# Altium PCB FMC_LPC接口.PcbDoc
Units mil, origin at the board's own origin, x right, y up, seen from the top; angles counter-clockwise.
Board outline 6000 x 4000 mil, 2 copper layers (Top Layer, Bottom Layer); 1 components, 0 nets, 164 pads, 0 vias.
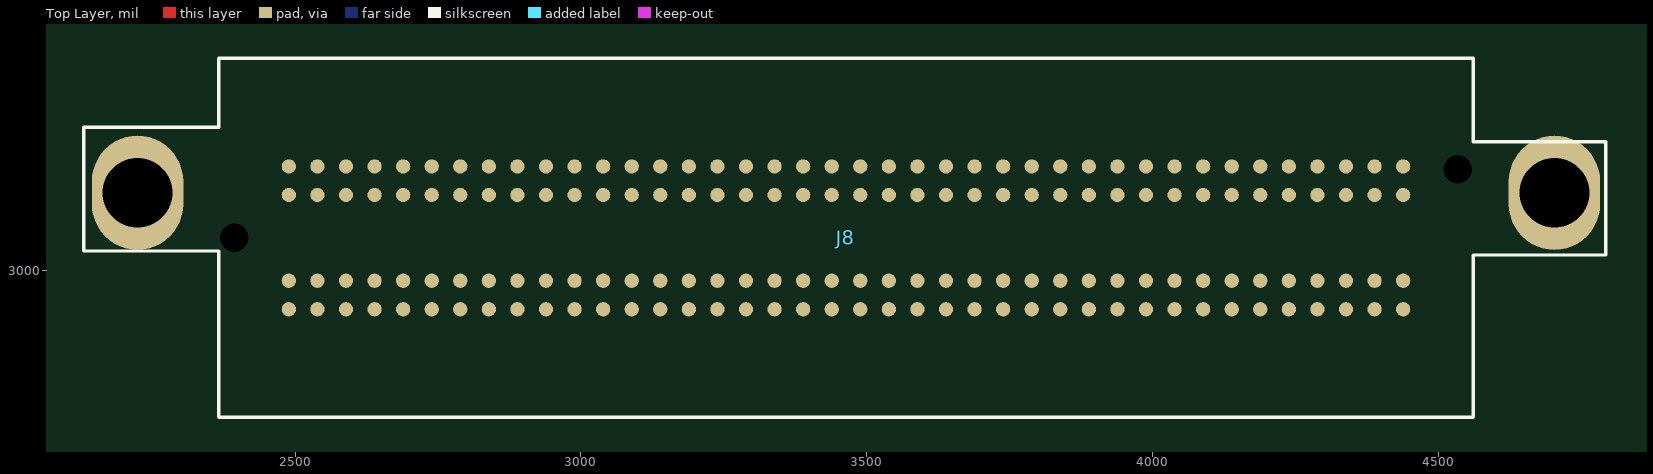
[diagram p0: Top Layer view]
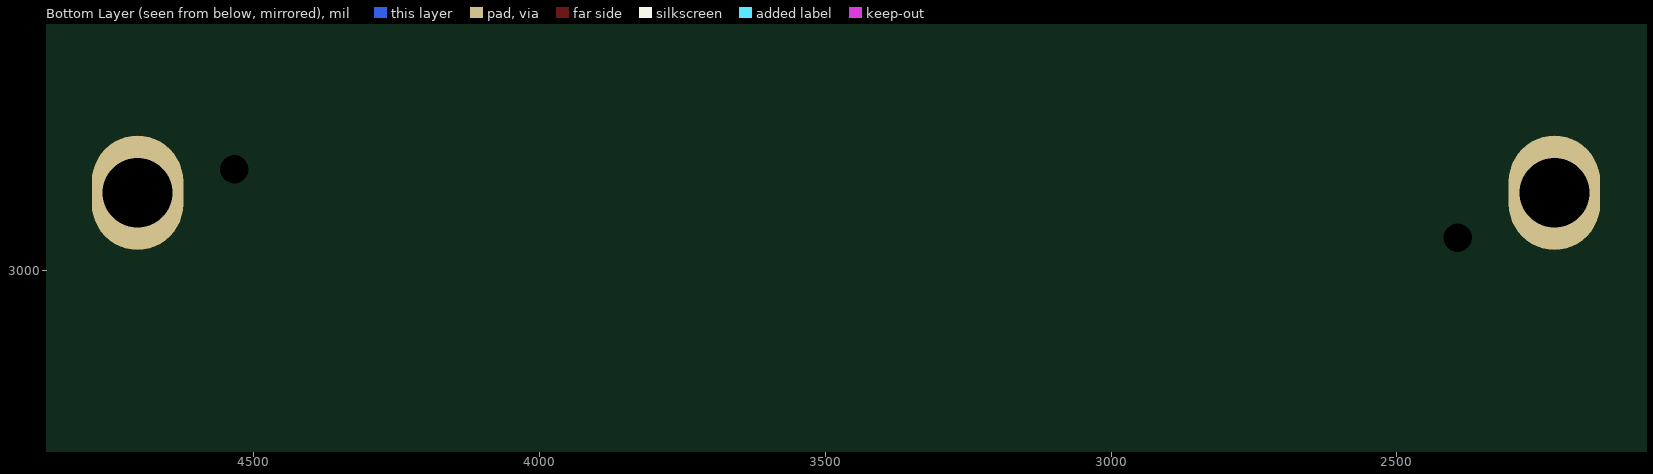
[diagram p1: Bottom Layer view, seen from below]

## Layer stack, top to bottom
Top Solder: solder mask 0.4, Solder Resist, Dk 3.5
Top Layer: signal copper 1.4
Dielectric 1: dielectric 12.6, FR-4, Dk 4.8
Bottom Layer: signal copper 1.4
Bottom Solder: solder mask 0.4, Solder Resist, Dk 3.5

## Board outline
1000,1000 7000,1000 7000,5000 1000,5000

## Design rules (kind name [scope] priority, off if disabled: settings)
Clearance [All] p1: gap=10 ignorepadtopadclearanceinfootprint=FALSE except(0: Arc-Hole Track-Hole SMDPad-Hole THPad-Hole Via-Hole Fill-Hole Poly-Hole Region-Hole Text-Hole)
PolygonConnect [All] p1: connectstyle=Relief reliefconductorwidth=10 reliefentries=4 polygonreliefangle="90 Angle" airgapwidth=10
RoutingVias [All] p1: holewidth=28 width=50 viastyle="Through Hole" minholewidth=28 minwidth=50 maxholewidth=28 maxwidth=50
SolderMaskExpansion [All] p1: expansion=4
Width [All] p1: maxlimit=10 minlimit=10 preferedwidth=10
30 further rules are at their usual default settings.

## Components (designator, comment, footprint, x,y, rotation, side; value= is the part's Value field where it differs from the comment)
J8 "ASP_134604-1" ASP-134604-1 3468,3048 r0 top locked

## Footprints (in the part's own frame and the unit in brackets; to place one, negate y for a bottom-side part, rotate by r counter-clockwise, add the part's x,y. Pads: shape width x height; smd on the part's side, far side on the other; paste and mask are expansions set on the pad)
ASP-134604-1 [mil]
  round 25 smd: C1(-979,-115) C2(-929,-115) C3(-879,-115) C4(-829,-115) C5(-779,-115) C6(-729,-115) C7(-679,-115) C8(-629,-115) C9(-579,-115) C10(-529,-115) C11(-479,-115) C12(-429,-115) C13(-379,-115) C14(-329,-115) C15(-279,-115) C16(-229,-115) C17(-179,-115) C18(-129,-115) C19(-79,-115) C20(-29,-115) C21(21,-115) C22(71,-115) C23(121,-115) C24(171,-115) C25(221,-115) C26(271,-115) C27(321,-115) C28(371,-115) C29(421,-115) C30(471,-115) C31(521,-115) C32(571,-115) C33(621,-115) C34(671,-115) C35(721,-115) C36(771,-115) C37(821,-115) C38(871,-115) C39(921,-115) C40(971,-115) D1(-979,-65) D2(-929,-65) D3(-879,-65) D4(-829,-65) D5(-779,-65) D6(-729,-65) D7(-679,-65) D8(-629,-65) D9(-579,-65) D10(-529,-65) D11(-479,-65) D12(-429,-65) D13(-379,-65) D14(-329,-65) D15(-279,-65) D16(-229,-65) D17(-179,-65) D18(-129,-65) D19(-79,-65) D20(-29,-65) D21(21,-65) D22(71,-65) D23(121,-65) D24(171,-65) D25(221,-65) D26(271,-65) D27(321,-65) D28(371,-65) D29(421,-65) D30(471,-65) D31(521,-65) D32(571,-65) D33(621,-65) D34(671,-65) D35(721,-65) D36(771,-65) D37(821,-65) D38(871,-65) D39(921,-65) D40(971,-65) G1(-979,85) G2(-929,85) G3(-879,85) G4(-829,85) G5(-779,85) G6(-729,85) G7(-679,85) G8(-629,85) G9(-579,85) G10(-529,85) G11(-479,85) G12(-429,85) G13(-379,85) G14(-329,85) G15(-279,85) G16(-229,85) G17(-179,85) G18(-129,85) G19(-79,85) G20(-29,85) G21(21,85) G22(71,85) G23(121,85) G24(171,85) G25(221,85) G26(271,85) G27(321,85) G28(371,85) G29(421,85) G30(471,85) G31(521,85) G32(571,85) G33(621,85) G34(671,85) G35(721,85) G36(771,85) G37(821,85) G38(871,85) G39(921,85) G40(971,85) H1(-979,135) H2(-929,135) H3(-879,135) H4(-829,135) H5(-779,135) H6(-729,135) H7(-679,135) H8(-629,135) H9(-579,135) H10(-529,135) H11(-479,135) H12(-429,135) H13(-379,135) H14(-329,135) H15(-279,135) H16(-229,135) H17(-179,135) H18(-129,135) H19(-79,135) H20(-29,135) H21(21,135) H22(71,135) H23(121,135) H24(171,135) H25(221,135) H26(271,135) H27(321,135) H28(371,135) H29(421,135) H30(471,135) H31(521,135) H32(571,135) H33(621,135) H34(671,135) H35(721,135) H36(771,135) H37(821,135) H38(871,135) H39(921,135) H40(971,135)
  oval 160x200 hole 122: S1(1235.8,88.8) S2(-1243.8,88.8)
  round 0 hole 50: ""(-1074.5,10) ""(1066.5,130)
  silkscreen extent -1338,-304 1326,324

## Nets (pads, with @x,y where several pads share a name; then routed paths per layer and width w, separated by ;. In a path a pad name is that pad's centre, name@x,y a point inside that pad or via, vN(x,y) a via of type N, cw(c..) or ccw(c..) an arc to the next point about the centre after c; other vN are vias at no path point)
pads on no net: J8. J8.C1 J8.C2 J8.C3 J8.C4 J8.C5 J8.C6 J8.C7 J8.C8 J8.C9 J8.C10 J8.C11 J8.C12 J8.C13 J8.C14 J8.C15 J8.C16 J8.C17 J8.C18 J8.C19 J8.C20 J8.C21 J8.C22 J8.C23 J8.C24 J8.C25 J8.C26 J8.C27 J8.C28 J8.C29 J8.C30 J8.C31 J8.C32 J8.C33 J8.C34 J8.C35 J8.C36 J8.C37 J8.C38 J8.C39 J8.C40 J8.D1 J8.D2 J8.D3 J8.D4 J8.D5 J8.D6 J8.D7 J8.D8 J8.D9 J8.D10 J8.D11 J8.D12 J8.D13 J8.D14 J8.D15 J8.D16 J8.D17 J8.D18 J8.D19 J8.D20 J8.D21 J8.D22 J8.D23 J8.D24 J8.D25 J8.D26 J8.D27 J8.D28 J8.D29 J8.D30 J8.D31 J8.D32 J8.D33 J8.D34 J8.D35 J8.D36 J8.D37 J8.D38 J8.D39 J8.D40 J8.G1 J8.G2 J8.G3 J8.G4 J8.G5 J8.G6 J8.G7 J8.G8 J8.G9 J8.G10 J8.G11 J8.G12 J8.G13 J8.G14 J8.G15 J8.G16 J8.G17 J8.G18 J8.G19 J8.G20 J8.G21 J8.G22 J8.G23 J8.G24 J8.G25 J8.G26 J8.G27 J8.G28 J8.G29 J8.G30 J8.G31 J8.G32 J8.G33 J8.G34 J8.G35 J8.G36 J8.G37 J8.G38 J8.G39 J8.G40 J8.H1 J8.H2 J8.H3 J8.H4 J8.H5 J8.H6 J8.H7 J8.H8 J8.H9 J8.H10 J8.H11 J8.H12 J8.H13 J8.H14 J8.H15 J8.H16 J8.H17 J8.H18 J8.H19 J8.H20 J8.H21 J8.H22 J8.H23 J8.H24 J8.H25 J8.H26 J8.H27 J8.H28 J8.H29 J8.H30 J8.H31 J8.H32 J8.H33 J8.H34 J8.H35 J8.H36 J8.H37 J8.H38 J8.H39 J8.H40 J8.S1 J8.S2